# EAGLE board Elements PCB (EAGLE 9.6.2)
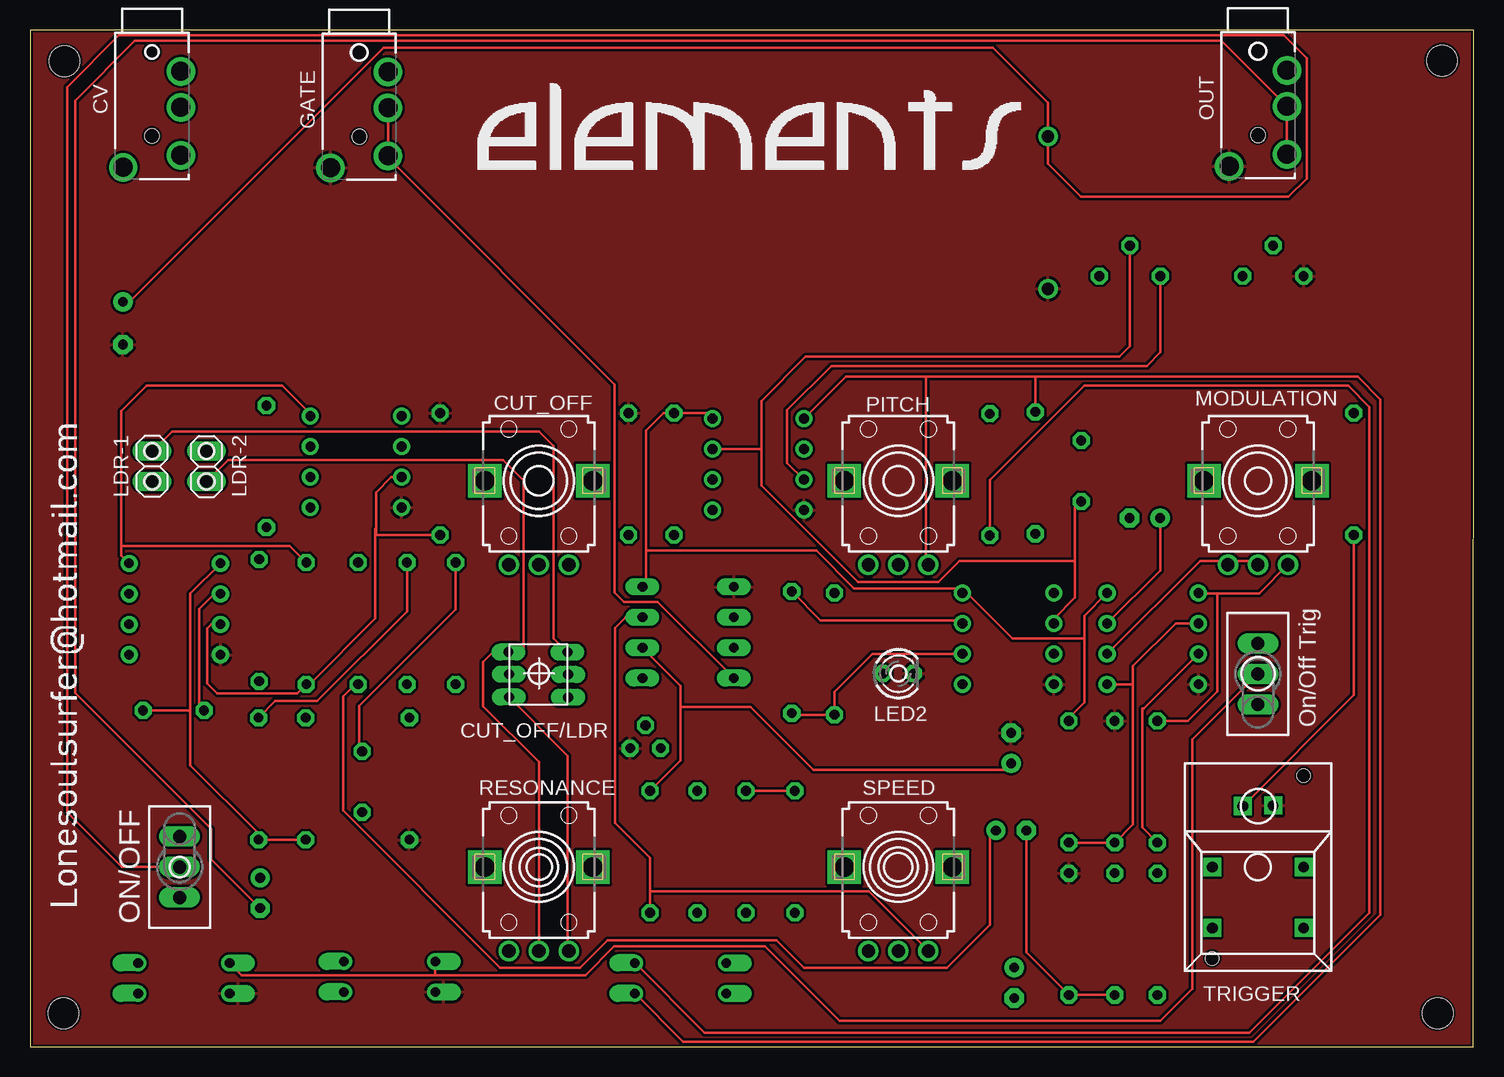
[diagram p0: board, top side]
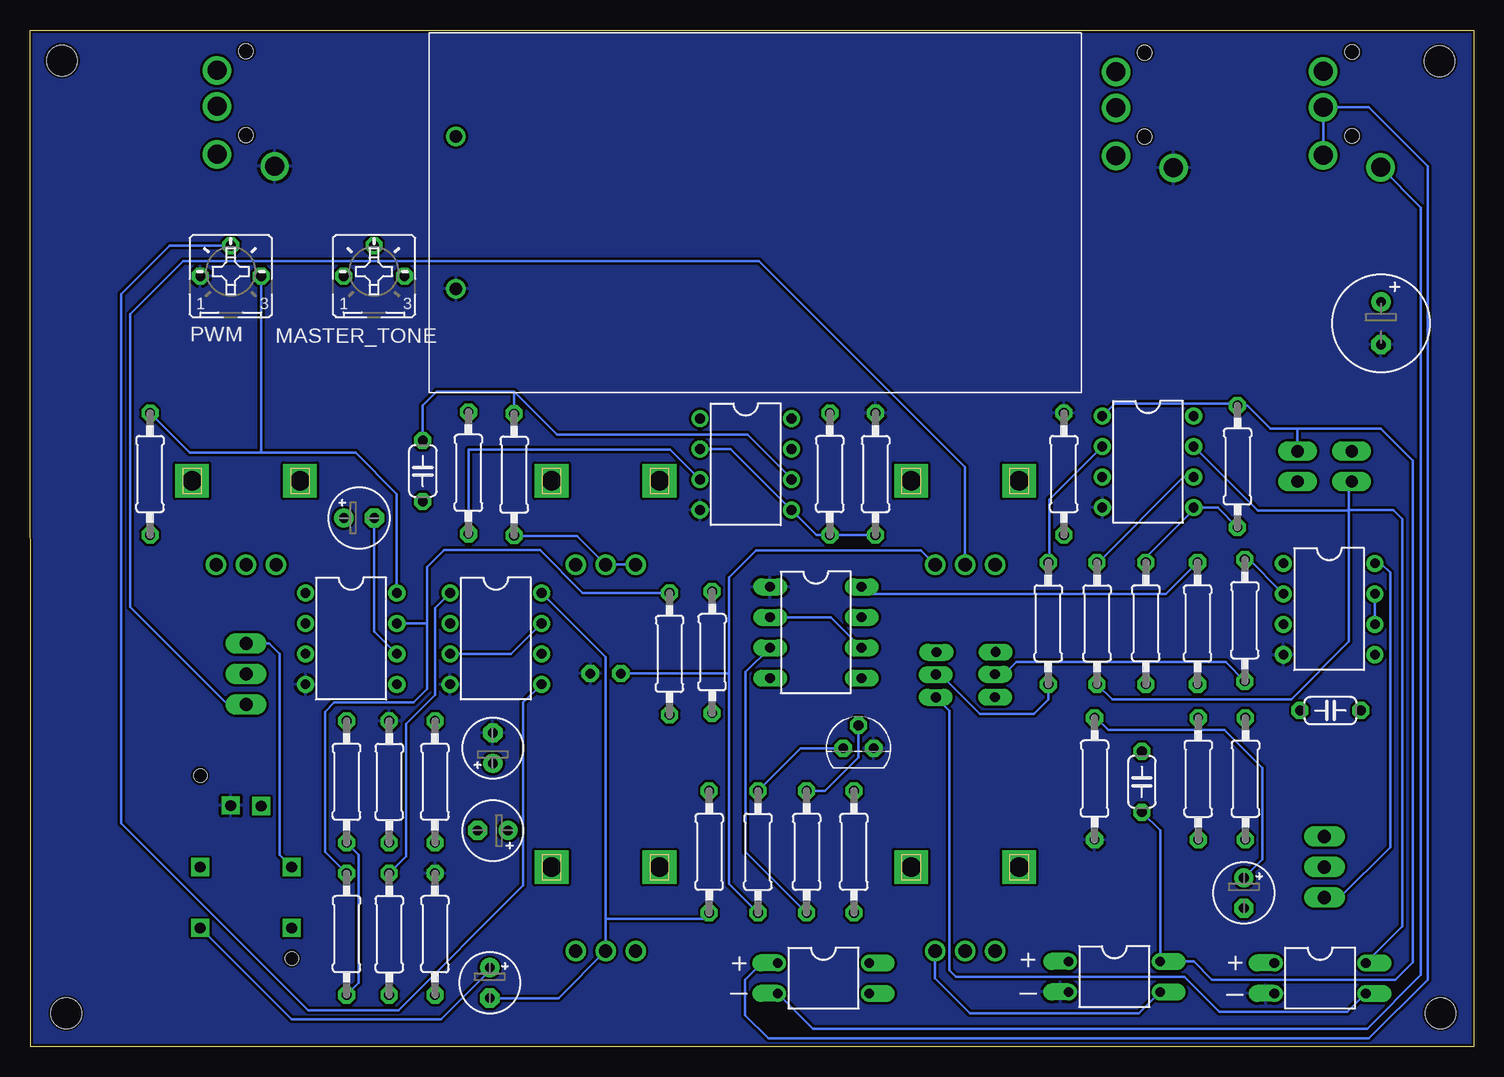
[diagram p1: board, bottom side, seen from below]

Size 120.37 x 84.78 mm. Coordinates in mm from the lower left corner, seen from the top.
Outline: 0,0 120.32,0 120.37,84.78 0,84.78 0,0
Copper layers (1*16): Top 0.035mm / dielectric 1.5mm / Bottom 0.035mm
Design rules "SparkFun": minimum track width 8mil, minimum drill 20mil, track to track 8mil, track to pad 8mil, pad to pad 8mil, via to via 8mil, smd to smd 8mil, copper to edge 8mil, drill to drill 8mil, minimum pad ring 12mil, minimum via ring 10mil, stop-mask expansion 4mil, vias tented up to drill 20mil, thermal gap 10mil
Holes 2.54 mm at 2.79,2.79 2.87,82.17 117.35,2.79 117.7,82.22

## Footprints (pad centres in the part's own frame; a part is rotated, then mirrored left to right if it is on the bottom)
BAT_BH9VPC = drill 1.016: + 24.945,-6.35; - 24.945,6.35
C050-024X044 = drill 0.813 octagon: 1 -2.54,0; 2 2.54,0
E2,5-5 = drill 0.813 pad 1.6: + -1.27,0 | drill 0.813 pad 1.6 octagon: - 1.27,0
E3,5-8 = drill 0.813 pad 1.6: + -1.778,0 | drill 0.813 pad 1.6 octagon: - 1.778,0
EVUF = drill 1.1 pad 1.676: 1 -2.5,-7; 2 0,-7; 3 2.5,-7 | drill 1.6 pad 2.8 square: M1 4.5,0; M2 -4.5,0
SWITCH-6PIN = drill 0.813 long: 1 -2.997,2.489; 2 -2.997,0.584; 3 -2.946,-1.27; 4 1.93,2.464; 5 1.93,0.559; 6 1.981,-1.295
PJ320A = drill 1.58 pad 2.37: 2 0,0; 3 3,0; 4 7,0; 5 8,-4.8 | hole 1.2: -1.6,-2.4; 5.4,-2.4
DIL08 = drill 0.813 pad 1.27: 1 -3.81,-3.81; 2 -1.27,-3.81; 3 1.27,-3.81; 4 3.81,-3.81; 5 3.81,3.81; 6 1.27,3.81; 7 -1.27,3.81; 8 -3.81,3.81
DIL-08 = drill 0.813 long: 1 -3.81,-3.81; 2 -1.27,-3.81; 3 1.27,-3.81; 4 3.81,-3.81; 5 3.81,3.81; 6 1.27,3.81; 7 -1.27,3.81; 8 -3.81,3.81
1X02 = drill 1.016 long: 1 -1.27,0; 2 1.27,0
LED3MM = drill 0.813 octagon: A -1.27,0; K 1.27,0
B25P = drill 0.813 octagon: A -2.54,0; E 2.54,0; S 0,2.54
DIL04 = drill 0.813 offset: 1 -1.27,-3.81; 2 1.27,-3.81; 3 1.27,3.81; 4 -1.27,3.81
TL3XPO = drill 1.1 pad 1.422 long: 1 -2.54,0; 2 0,0; 3 2.54,0
TO92 = drill 0.813 octagon: 1 1.27,0; 2 0,1.905; 3 -1.27,0
0207/10 = drill 0.813 octagon: 1 -5.08,0; 2 5.08,0
5501-1LED = drill 0.9 pad 1.5 square: 1A 0,3.81; 1B 0,-3.81; + -5.08,-1.27; - -5.131,1.27; NC 5.08,-3.81; NO 5.08,3.81 | hole 1.1: -7.62,3.81; 7.62,-3.81

## Placement (x,y rotation side)
BT1  BH9VPC  [BAT_BH9VPC]  59.92,69.55 180 bottom
C1  150nf  [C050-024X044]  87.63,48.01 270 bottom
C2  2.2uF  [E2,5-5]  92.94,44.09 0 bottom
C3  4.7uF  [E2,5-5]  81.79,18.03 180 bottom
C4  1nF  [C050-024X044]  27.69,22.1 270 bottom
C5  1nF  [C050-024X044]  11.96,28.04 0 bottom
C6  4.7uF  [E2,5-5]  19.18,12.83 270 bottom
C7  100uf  [E2,5-5]  82.04,5.33 270 bottom
C8  470uf  [E3,5-8]  7.75,60.33 270 bottom
C11  100uf  [E2,5-5]  81.79,24.89 90 bottom
CUT_OFF  50k  [EVUF]  42.42,47.19 0 top
CUT_OFF/LDR  SWITCH-6PIN  [SWITCH-6PIN]  41.86,31.62 180 top
CV  PJ-320A  [PJ320A]  12.57,81.33 270 top
GATE  PJ-320A  [PJ320A]  29.84,81.28 270 top
IC1  LM358N  [DIL08]  60.71,48.56 270 bottom
IC2  LM358N  [DIL08]  93.6,34.04 270 bottom
IC3  LM358N  [DIL08]  81.53,34.04 270 bottom
IC4  LM358N  [DIL08]  27.18,48.77 270 bottom
IC5  LM358N  [DIL08]  12.07,36.5 270 bottom
IC7  NE555  [DIL-08]  54.86,34.54 270 bottom
LDR-1  [1X02]  10.19,48.39 270 top
LDR-2  [1X02]  14.71,48.39 90 top
LED2  [LED3MM]  72.39,31.11 0 top
MASTER_TONE  50k  [B25P]  91.69,64.26 0 bottom
MODULATION  1M  [EVUF]  102.36,47.19 0 top
OK1  PC817  [DIL04]  12.83,5.71 270 bottom
OK2  PC817  [DIL04]  54.23,5.71 270 bottom
OK3  PC817  [DIL04]  29.97,5.84 270 bottom
ON/OFF  TL36PO  [TL3XPO]  12.47,14.99 270 top
ON/OFF_TRIG  TL36PO  [TL3XPO]  102.36,31.09 90 top
OUT  PJ-320A  [PJ320A]  104.77,81.41 270 top
PITCH  100K  [EVUF]  72.39,47.19 0 top
PWM  100K  [B25P]  103.63,64.26 0 bottom
Q1  BC547B  [TO92]  51.31,24.89 0 bottom
R1  100k  [0207/10]  53.7,47.75 90 bottom
R2  100k  [0207/10]  49.89,47.75 270 bottom
R3  100k  [0207/10]  90.42,22.1 270 bottom
R4  100k  [0207/10]  86.61,22.1 90 bottom
R5  47k  [0207/10]  83.82,47.85 90 bottom
R6  20K  [0207/10]  35.48,35.31 270 bottom
R7  100k  [0207/10]  67.06,32.77 90 bottom
R8  22k  [0207/10]  63.5,32.89 90 bottom
R9  10k  [0207/10]  22.99,22.35 270 bottom
R10  10k  [0207/10]  86.61,9.4 90 bottom
R11  22K  [0207/10]  90.42,9.4 270 bottom
R12  47k  [0207/10]  27.36,35.31 90 bottom
R13  22k  [0207/10]  31.42,35.31 270 bottom
R14  390k  [0207/10]  19.71,48.39 90 bottom
R15  100k  [0207/10]  23.04,35.31 90 bottom
R16  47k  [0207/10]  93.98,22.1 90 bottom
R17  22K  [0207/10]  31.62,22.35 90 bottom
R18  22k  [0207/10]  93.98,9.4 90 bottom
R19  100k  [0207/10]  34.19,47.75 270 bottom
R20  20K  [0207/10]  19.1,35.56 270 bottom
R21  22k  [0207/10]  19.05,22.35 270 bottom
R22  10K  [0207/10]  80.01,47.7 270 bottom
R23  220R  [0207/10]  110.36,47.75 270 bottom
R38  100R  [0207/10]  51.69,16.26 90 bottom
R39  1K  [0207/10]  55.63,16.26 90 bottom
R40  100R  [0207/10]  59.69,16.26 270 bottom
R41  1K  [0207/10]  63.75,16.26 90 bottom
RESONANCE  1M  [EVUF]  42.42,14.99 0 top
SPEED  10k  [EVUF]  72.39,14.99 0 top
TRIGGER  5501-1LED  [5501-1LED]  102.36,14.99 270 top

## Library data of the parts
BT1 = BH9VPC-no holes; AVAILABILITY: Warning; DESCRIPTION: BATTERY HOLDER 9V PC PIN; MF: MPD (Memory Protection Devices); MP: BH9VPC; PACKAGE: None; PRICE: None; PURCHASE-URL: https://pricing.snapeda.com/search/part/BH9VPC/?ref=eda
C1-C8 C11 = rcl; SPICEPREFIX: C
CUT_OFF MASTER_TONE MODULATION PITCH PWM RESONANCE SPEED = pot
CUT_OFF/LDR = My Library
CV GATE OUT = PJ-320A; DESCRIPTION: 3.5 mm Audio Jack Connector PCB Mount Female Socket 4 Pin PJ-320A; HEIGHT: 5.3mm; MANUFACTURER_NAME: XKB Connectivity; MANUFACTURER_PART_NUMBER: PJ-320A
IC1-IC5 = linear
IC7 = st-microelectronics; MF: Arrow Electronics; MPN: NE555N; OC_FARNELL: 1467742; OC_NEWARK: 89K1486
LDR-1 LDR-2 = pinhead
LED2 = led
OK1-OK3 = optocoupler; MPN: PC817X4J000F; OC_FARNELL: 9707727; OC_NEWARK: 97K7059
ON/OFF ON/OFF_TRIG TRIGGER = switch
Q1 = transistor-npn
R1-R23 R38-R41 = rcl; SPICEPREFIX: R

## Nets
CONN1: IC4.7 LDR-1.2 OK1.4 R13.2
CONN2: CUT_OFF/LDR.2 R6.2
CONN3: C4.2 IC4.1 LDR-2.2 OK3.4 R14.2
CONN4: CUT_OFF/LDR.5 R20.2
GND: BT1.- C8.- C11.- GATE.5 IC1.4 IC2.4 IC3.4 IC4.4 IC5.4 IC7.1 LED2.K OK1.2 OK3.2 OUT.5 PWM.A Q1.1 R2.1 R3.1 R10.2 R17.1 R19.1 TRIGGER.-
N$1: IC1.3 MASTER_TONE.A R5.1
N$2: C1.1 IC1.6 R22.1
N$3: IC1.2 IC1.5 R1.1 R2.2
N$4: C1.2 IC1.7 IC3.2 MASTER_TONE.S
N$5: CUT_OFF.2 ON/OFF_TRIG.1
N$6: IC2.2 IC2.5 R3.2 R4.1
N$7: IC2.3 R16.1 R18.1
N$8: IC2.1 MODULATION.3 R16.2
N$10: C2.- IC2.6 MODULATION.1 MODULATION.2
N$11: C2.+ IC2.7 R7.2 R18.2
N$12: IC3.6 R7.1 R8.1
N$13: IC3.3 IC3.7 R8.2
N$14: IC3.5 PWM.S
N$15: IC3.1 R11.1
N$16: C6.+ R9.1 R17.2
N$17: C3.+ R12.1
N$18: IC4.5 R12.2 R14.1
N$19: IC4.6 R13.1 R21.1
N$21: C6.- OUT.3 OUT.4
N$22: C5.2 IC5.1 R9.2 R21.2
N$23: C4.1 IC4.2 R6.1
N$24: IC4.3 IC5.3 R15.1 R19.2
N$26: C3.- R10.1 R11.2
N$27: C5.1 IC5.2 R20.1
N$28: OK2.4 PITCH.1 PITCH.2 R22.2
N$29: IC5.6 IC5.7
N$30: CV.5 OK2.2
N$31: CV.3 CV.4 OK2.1
N$32: ON/OFF_TRIG.3 TRIGGER.1B
N$33: C7.+ TRIGGER.NO
N$34: R23.2 TRIGGER.+
N$38: OK1.1 OK3.1 ON/OFF_TRIG.2
N$41: GATE.3 GATE.4 IC7.4
N$42: BT1.+ C8.+ ON/OFF.2
N$50: IC1.1 OK2.3 PITCH.3 R5.2
N$54: CUT_OFF.3 LED2.A R40.2
N$56: CUT_OFF/LDR.3 LDR-1.1
N$57: CUT_OFF/LDR.1 OK1.3
N$58: CUT_OFF/LDR.6 LDR-2.1 RESONANCE.2
N$59: CUT_OFF/LDR.4 OK3.3 RESONANCE.3
N$60: C11.+ IC7.2 IC7.6 R38.2
N$61: IC7.7 R38.1 SPEED.3
N$62: Q1.3 R40.1 R41.2
N$63: IC7.3 R39.1
N$64: Q1.2 R39.2
VCC: C7.- IC1.8 IC2.8 IC3.8 IC4.8 IC5.8 IC7.8 ON/OFF.3 PWM.E R1.2 R4.2 R15.2 R23.1 R41.1 SPEED.2

## Tracks (layer width: path | path; a pad name or v marks a point on that pad's centre or on a via)
CONN1
  Bottom 0.203: OK1.4 5.97,10.03 5.97,44.02 6.71,44.76 10.41,44.76 | IC4.7 18.03,44.7 10.41,44.7 | R13.2 30.15,28.96 15.24,28.96 10.41,33.78 10.41,44.7 | 10.41,44.76 10.41,44.7 | LDR-1.2 10.41,46.89 10.41,44.76
CONN2
  Bottom 0.203: CUT_OFF/LDR.2 44.48,31.04 41.17,27.74 36.7,27.74 35.48,28.96 R6.2
CONN3
  Bottom 0.203: 14.71,51.56 16.97,51.56 18.87,53.47 R14.2 19.71,53.65 29.92,53.65 IC4.1 | 14.71,51.56 LDR-2.2 | 14.71,51.56 7.75,51.56 5.08,48.9 5.08,7.05 6.54,5.59 21.84,5.59 23.37,7.11 OK3.4 26.16,18.03 C4.2
CONN4
  Bottom 0.203: CUT_OFF/LDR.5 39.17,31.06 38.15,32.08 20.7,32.08 R20.2
GND
  pour Top: 0,84.79 120.14,84.79 120.14,0 0,0
  pour Bottom: 0,84.79 120.4,84.79 120.4,0 0,0
N$1
  Top 0.203: IC1.3 63.12,48.69 63.12,53.09 66.8,56.77 93.09,56.77 94.23,57.91 MASTER_TONE.A
  Bottom 0.203: IC1.3 67,49.78 83.82,49.78 R5.1
N$2
  Bottom 0.203: R22.1 80.01,54.61 | IC1.6 56.9,47.4 60.55,51.05 76.45,51.05 80.01,54.61 | 80.01,54.61 86.49,54.61 87.63,53.47 C1.1
N$3
  Bottom 0.203: IC1.2 61.98,49.84 IC1.5 54.81,42.67 R1.1 R2.2
N$4
  Top 0.203: C1.2 87.12,44.96 87.12,40.51 | 87.12,40.51 87.12,37.47 85.34,35.69 IC3.2 | 87.12,40.51 77.47,40.51 75.72,38.76 69,38.76 60.96,46.8 60.96,49.91 | MASTER_TONE.S 91.69,58.42 90.8,57.53 64.64,57.53 60.96,53.85 60.96,49.91 | IC1.7 60.88,49.84 60.96,49.91
N$5
  Bottom 0.203: CUT_OFF.2 42.42,48.32 59.6,65.51 107.59,65.51 112.01,61.09 112.01,36.68 103.89,28.55 ON/OFF_TRIG.1
N$6
  Top 0.203: IC2.5 91.95,30.23 | IC2.2 95.5,35.31 91.95,31.75 91.95,30.23 | R4.1 R3.2 91.95,18.54 91.95,30.23
N$7
  Top 0.203: IC2.3 92.84,28.19 92.71,28.19 92.71,18.29 R16.1
  Bottom 0.203: R16.1 92.96,16 92.96,5.33 R18.1
N$8
  Top 0.203: R16.2 96.52,27.18 98.96,29.62 98.96,37.8 | 98.96,37.8 97.46,37.8 IC2.1 | 98.96,37.8 102.46,37.8 MODULATION.3
N$10
  Top 0.203: MODULATION.2 102.03,40.52 99.95,40.52 | 99.95,40.52 97.55,40.52 IC2.6 | MODULATION.1 99.86,40.44 99.95,40.52
  Bottom 0.203: IC2.6 91.67,34.65 C2.-
N$11
  Top 0.203: C2.+ 94.21,39.73 IC2.7
  Bottom 0.203: R7.2 74.3,37.85 77.85,41.4 85.85,41.4 87.25,40.01 87.25,35.31 | IC2.7 87.25,35.31 | R18.2 95.76,16.26 95.76,27.94 95,28.7 88.39,28.7 87.25,29.84 87.25,32.13 87.25,32.26 87.25,35.31
N$12
  Top 0.203: R8.1 63.63,27.69 R7.1 67.06,29.59 70.23,32.77 IC3.6
N$13
  Top 0.203: R8.2 65.91,35.56 77.47,35.56 IC3.7
  Bottom 0.203: IC3.3 80.26,32.77 IC3.7
N$14
  Bottom 0.203: IC3.5 79.25,28.7 79.25,13.46 89.66,3.05 97.19,3.05 112.78,18.63 112.78,62.74 108.71,66.8 PWM.S
N$15
  Bottom 0.203: IC3.1 86.61,36.58 86.61,29.34 89.03,26.92 89.03,15.88 R11.1
N$16
  Bottom 0.203: R17.2 31.5,27.43 30.48,26.42 23.11,26.42 23.11,27.3 R9.1 22.99,26.42 20.83,26.42 17.65,23.24 17.65,15.62 C6.+
N$17
  Top 0.203: C3.+ 80.01,17.53 80.01,10.16 76.45,6.6 64.52,6.6 62.23,8.89 48.13,8.89 45.85,6.6 39.18,6.6 26.09,19.7 26.09,29.21 27.1,30.23 R12.1
N$18
  Bottom 0.203: R14.1 21.36,44.96 IC4.5 23.37,44.78 27.25,40.89 27.25,40.49 R12.2
N$19
  Top 0.203: R13.1 31.42,36.3 23.95,28.83 20.45,28.83 R21.1
  Bottom 0.203: R13.1 31.32,40.39 24.21,47.5 IC4.6
N$21
  Top 0.203: OUT.4 OUT.3 99.32,83.86 8.73,83.86 3.76,78.89 3.76,29.52 15.11,18.16 15.11,15.62 C6.-
N$22
  Top 0.203: IC5.1 13.36,37.8 13.36,27.94 | R9.2 R21.2 19.05,17.78 13.36,23.47 13.36,27.94 | C5.2 13.26,28.04 13.36,27.94
N$23
  Top 0.203: R6.1 35.48,40.64 35.48,36.48 27.43,28.44 27.43,24.64 C4.1
  Bottom 0.203: R6.1 35.38,40.49 35.38,45.64 IC4.2
N$24
  Top 0.203: IC4.3 30.12,47.5 28.85,46.23 28.85,43.18 | 28.85,43.18 28.85,42.67 R19.2 | 28.85,43.18 28.78,43.18 28.78,35.71 23.29,30.23 R15.1 22.28,29.46 15.62,29.46 14.78,30.3 14.78,34.9 15.11,35.23 IC5.3
N$26
  Top 0.203: R11.2 R10.1 83.06,7.87 C3.-
N$27
  Top 0.203: C5.1 14.12,28.42 14.12,36.52 15.37,37.77 IC5.2
  Bottom 0.203: IC5.2 18.92,40.82 R20.1
N$28
  Top 0.203: R22.2 80.01,47.24 87.88,55.12 109.88,55.12 111.66,53.34 111.66,11.18 101.65,1.17 56.24,1.17 OK2.4
  Bottom 0.203: R22.2 79.96,42.57 74.77,42.57 PITCH.2 PITCH.1
N$29
  Bottom 0.203: IC5.7 IC5.6
N$30
  Bottom 0.203: OK2.2 55.12,1.52 8.89,1.52 4.42,5.99 4.42,69.98 CV.5
N$31
  Bottom 0.203: OK2.1 59.36,6.98 60.76,5.59 60.76,2.64 58.83,0.71 8.75,0.71 3.86,5.6 3.86,73.41 8.79,78.33 CV.3 CV.4
N$32
  Bottom 0.203: TRIGGER.1B 99.57,16 99.57,32.77 100.43,33.63 ON/OFF_TRIG.3
N$33
  Bottom 0.203: C7.+ 82.04,6.35 86.11,2.29 98.55,2.29 TRIGGER.NO
N$34
  Top 0.203: R23.2 110.36,29.34 TRIGGER.+
N$38
  Top 0.203: OK1.1 17.65,5.97 33.78,5.97 | OK3.1 33.78,5.97 | ON/OFF_TRIG.2 96.9,25.63 96.9,4.83 94.23,2.16 67.5,2.16 61.27,8.38 48.71,8.38 46.3,5.97 33.78,5.97
N$41
  Top 0.203: IC7.4 52.32,37.08 49.53,37.08 48.74,37.87 48.74,55.23 29.84,74.13 GATE.4 GATE.3
N$42
  Top 0.203: ON/OFF.2 7.65,14.99 3.1,19.53 3.1,80.01 7.42,84.33 104.52,84.33 106.43,82.42 106.43,72.39 104.9,70.87 87.61,70.87 84.86,73.61 BT1.+ 84.86,78.71 80.26,83.31 29.46,83.31 8.26,62.1 C8.+
N$50
  Top 0.203: 74.73,55.88 74.68,55.83 74.68,40.41 PITCH.3 | 83.82,55.88 110.67,55.88 112.57,53.98 112.57,11.02 101.98,0.43 54.43,0.43 OK2.3 | 83.82,55.88 74.73,55.88 | 74.73,55.88 68.02,55.88 IC1.1 | 83.82,55.88 R5.2
N$54
  Bottom 0.203: LED2.A 62.1,31.11 | 62.1,31.11 62.1,13.59 R40.2 | CUT_OFF.3 46.1,41.38 59.87,41.38 62.1,39.14 62.1,31.11
N$56
  Top 0.203: CUT_OFF/LDR.3 43.66,34.04 43.66,50.09 42.44,51.31 11.84,51.31 LDR-1.1
N$57
  Bottom 0.203: OK1.3 10.54,2.92 21.21,2.92 24.13,5.84 43.18,5.84 43.71,6.38 43.71,27.99 CUT_OFF/LDR.1
N$58
  Top 0.203: RESONANCE.2 42.42,23.73 37.77,28.38 37.77,32.08 38.61,32.92 CUT_OFF/LDR.6 41.15,32.92 41.15,47.19 39.42,48.92 16.51,48.92 LDR-2.1
N$59
  Top 0.203: RESONANCE.3 44.83,8.07 44.83,24.26 CUT_OFF/LDR.4
  Bottom 0.203: RESONANCE.3 44.92,5.7 42.01,2.79 27.94,2.79 OK3.3
N$60
  Top 0.203: 54.23,28.32 60.07,28.32 65.31,23.08 81.24,23.08 C11.+ | IC7.6 54.23,30.1 54.23,28.32 | R38.2 54.23,23.88 54.23,28.32
  Bottom 0.203: IC7.6 53.59,35.81 IC7.2
N$61
  Top 0.203: SPEED.3 69.92,12.95 51.69,12.95 | IC7.7 49.66,35.81 48.77,34.92 48.77,18.67 51.69,15.75 51.69,12.95 | R38.1 51.69,12.95
N$62
  Top 0.203: R41.2 R40.1
  Bottom 0.203: Q1.3 56.13,24.89 R40.1
N$63
  Bottom 0.203: IC7.3 60.71,31.24 60.71,16.26 R39.1
N$64
  Bottom 0.203: Q1.2 51.31,24.13 54.1,21.34 R39.2
VCC
  Top 0.203: 77.72,38.23 81.91,34.04 87.88,34.04 | IC5.8 7.59,40.97 7.59,41.76 | 7.59,41.76 7.59,52.98 9.73,55.12 21.03,55.12 23.37,52.78 IC4.8 | 51.36,41.38 51.36,38.66 IC7.8 | 51.36,41.38 65.56,41.38 68.71,38.23 77.72,38.23 | IC3.8 78.1,38.23 77.72,38.23 | IC1.8 56.44,52.83 R1.2 52.83,52.83 51.36,51.36 51.36,41.38 | 87.88,34.04 87.88,35.94 IC2.8 | 87.88,34.04 87.88,28.7 86.61,27.43 R4.2 | R15.2 21.67,41.76 7.59,41.76
  Bottom 0.203: SPEED.2 72.39,32.51 IC3.8 | IC7.8 50.99,38.42 50.32,37.74 25.68,37.74 R15.2 | IC5.8 7.75,40.31 6.99,39.55 6.99,16.64 11.18,12.45 ON/OFF.3 | R41.1 64.26,10.67 72.39,10.67 SPEED.2 | C7.- 76.31,4.06 SPEED.2 | 101.09,49.53 93.22,49.53 89.79,46.1 IC2.8 | 101.09,49.53 PWM.E | R23.1 107.06,49.53 101.09,49.53

## Text on the board
tPlace: On/Off Trig
bPlace: + | + | + | _ | _ | _